# EAGLE board pnp-test (EAGLE 7.2.0)

Size 37 x 28 mm. Coordinates in mm from the lower left corner, seen from the top.
Outline: 0,0 0,28 37,28 37,0 0,0
Copper layers (1*16): Top 0.035mm / dielectric 1.5mm / Bottom 0.035mm
Design rules "default": minimum track width 10mil, minimum drill 24mil, track to track 8mil, track to pad 8mil, pad to pad 8mil, via to via 8mil, smd to smd 8mil, copper to edge 40mil, drill to drill 8mil, minimum pad ring 10mil, minimum via ring 8mil, stop-mask expansion 4mil, vias tented up to drill 0mil, thermal gap 10mil

## Footprints (pad centres in the part's own frame; a part is rotated, then mirrored left to right if it is on the bottom)
FIDUCIAL-1X2 = smd 1 x 1: 1 0,0
R0805 = smd 1.3 x 1.5: 1 -0.95,0; 2 0.95,0
R0402 = smd 0.7 x 0.9: 1 -0.65,0; 2 0.65,0
R0201 = smd 0.28 x 0.43: 1 -0.255,0; 2 0.255,0
R0603 = smd 1 x 1.1: 1 -0.85,0; 2 0.85,0

## Placement (x,y rotation side)
FID1  FIDUCIAL1X2  [FIDUCIAL-1X2]  2,2 0 top
FID2  FIDUCIAL1X2  [FIDUCIAL-1X2]  34.5,26.5 0 top
FID3  FIDUCIAL1X2  [FIDUCIAL-1X2]  34.5,2 0 top
FID4  FIDUCIAL1X2  [FIDUCIAL-1X2]  34.5,2 0 bottom
FID5  FIDUCIAL1X2  [FIDUCIAL-1X2]  2.5,26.5 0 bottom
FID6  FIDUCIAL1X2  [FIDUCIAL-1X2]  2,2 0 bottom
R1  1K  [R0805]  31,6 0 top
R2  1K  [R0805]  31,11 90 top
R3  1K  [R0805]  25,6 45 top
R4  1K  [R0402]  31,17 90 top
R5  1K  [R0402]  31,22 0 top
R6  1K  [R0402]  25,22 45 top
R7  1K  [R0201]  12,22 315 top
R8  1K  [R0201]  6,22 0 top
R9  1K  [R0201]  6,17 270 top
R10  1K  [R0603]  6,11 270 top
R11  1K  [R0603]  6,6 0 top
R12  1K  [R0603]  12,6 315 top
R13  1K  [R0805]  6,6 0 bottom
R14  1K  [R0201]  31,22 0 bottom
R15  1K  [R0201]  25,22 315 bottom
R16  1K  [R0201]  31,17 270 bottom
R17  1K  [R0402]  12,22 45 bottom
R18  1K  [R0402]  6,22 0 bottom
R19  1K  [R0402]  6,17 90 bottom
R20  1K  [R0603]  31,11 270 bottom
R21  1K  [R0603]  25,6 315 bottom
R22  1K  [R0603]  31,6 0 bottom
R23  1K  [R0805]  6,11 90 bottom
R24  1K  [R0805]  12,6 45 bottom

## Library data of the parts
FID1-FID6 = SparkFun
R1-R24 = rcl

## Text on the board
tNames: FID2 | 0201 | 0402 | 0603 | 0805 | FID1 | FID3
bNames: FID5 | 0402 | 0201 | 0805 | 0603 | FID4 | FID6